# Altium PCB Industrial_IOT_Dev_Brd-v2.0.PcbDoc (part 4 of 5)
Units mil, origin at the board's own origin, x right, y up, seen from the top; angles counter-clockwise.
Board outline 3543.31 x 4724.41 mil, 2 copper layers (Top Layer, Bottom Layer), stack 61.889 mil thick; 159 components, 96 nets, 479 pads, 141 vias.
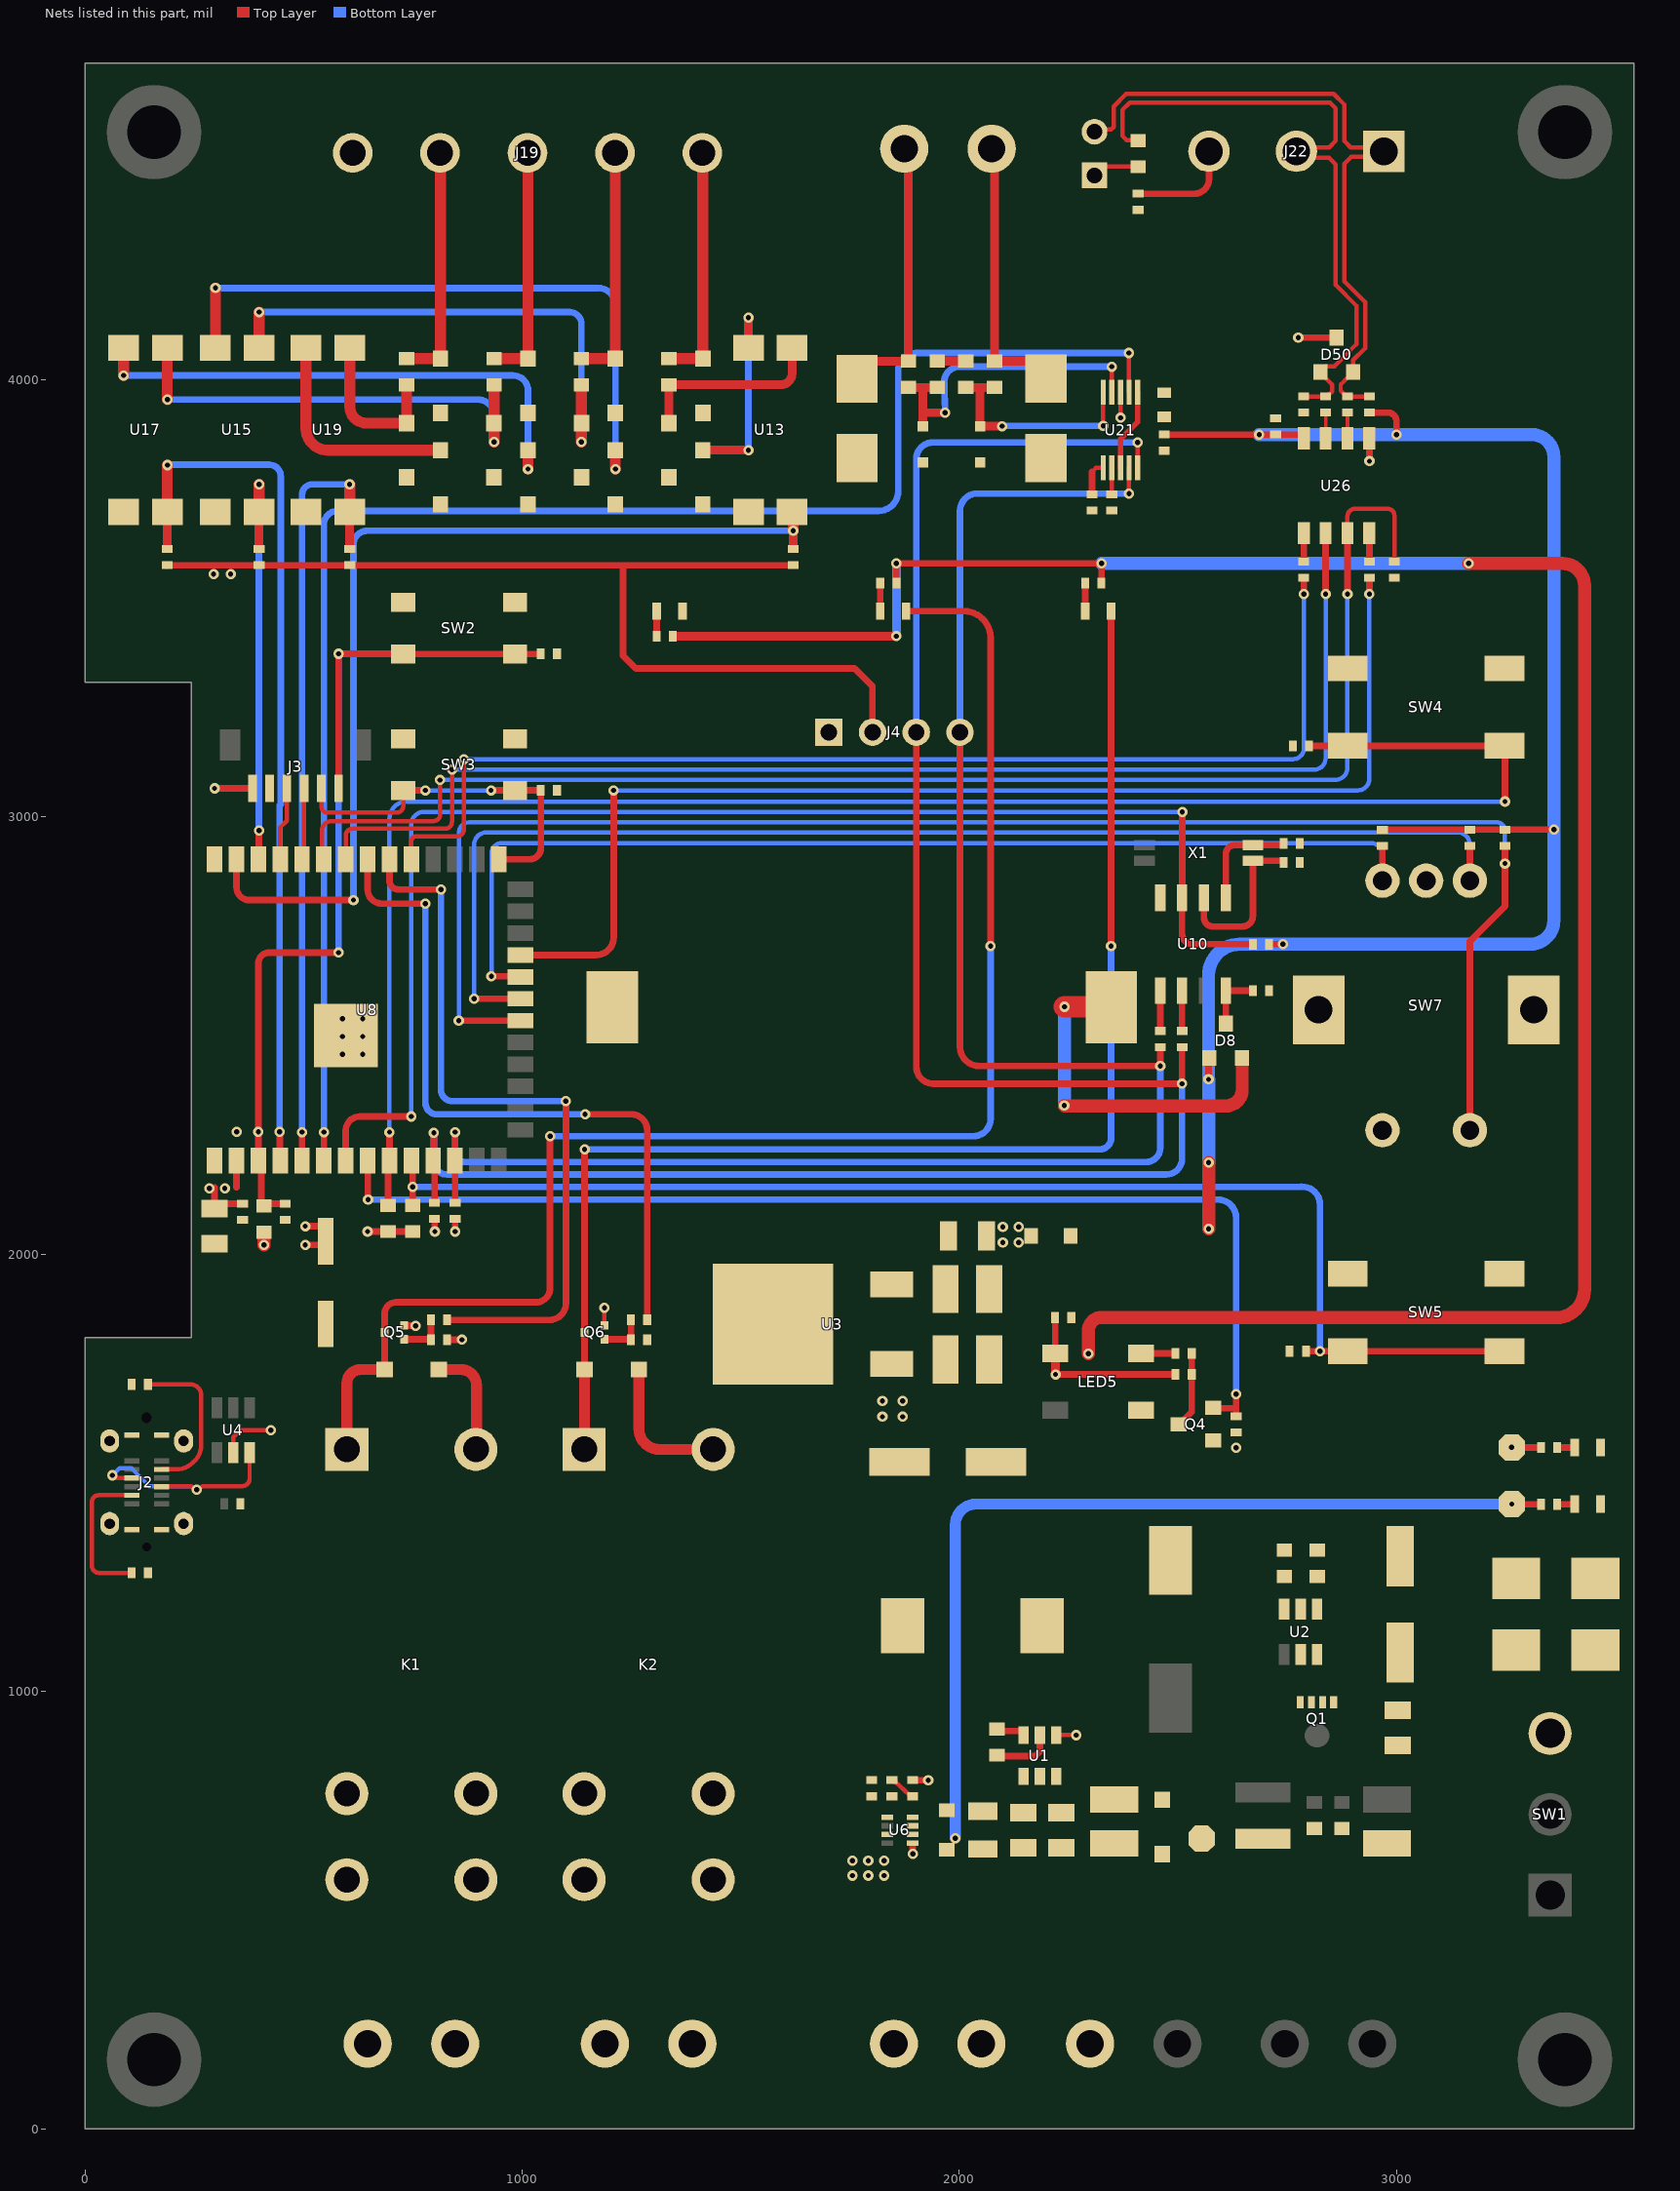
[diagram p2: the nets of this part, all layers, seen from the top]

## Via types
v1: diameter 23.62, hole 11.81, Top Layer to Bottom Layer, tented both sides, 141 vias

## Nets (pads, with @x,y where several pads share a name; then routed paths per layer and width w, separated by ;. In a path a pad name is that pad's centre, name@x,y a point inside that pad or via, vN(x,y) a via of type N, cw(c..) or ccw(c..) an arc to the next point about the centre after c; other vN are vias at no path point) (continued)
ENC_CHA: (continued)
  Top Layer w15: v1(890,2584.34) U8.21@992.63,2584.34 ; SW7.A@3167.73,2854.34 R41.1@3167.73,2934.27
  Bottom Layer w10: v1(890,2584.34) 890,2936.24 cw(c918.41,2936.24) 918.41,2964.65 3139.89,2964.65 cw(c3139.89,2936.81) 3167.73,2936.81 SW7.A@3167.73,2854.34
ENC_CHB: R42.1 SW7.B U8.22 | length 2550.9
  Top Layer w15: v1(929.52,2635.84) U8.22@994.13,2635.84 ; SW7.B@2967.73,2854.34 R42.1@2967.73,2934.27
  Bottom Layer w10: v1@930,2636.32 930,2917.61 cw(c952.4,2917.61) 952.4,2940.01 2941.91,2940.01 cw(c2941.91,2914.2) 2967.73,2914.2 SW7.B@2967.73,2854.34
ESP-EN: C29.2 C30.2 J3.6 R28.1 SW2.3 SW2.4 U8.3 | length 2262.8
  Top Layer w15: C29.2@457.79,2115.5 414.97,2115.5 R28.1@409.47,2110 403.17,2116.3 403.17,2207.9 U8.3@396.42,2214.66 v1(396.42,2279.83) 396.42,2664.7 cw(c421.72,2664.7) 421.72,2690 v1(580.23,2690) ; v1@580.23,3373.24 727.79,3373.24 SW2.3@727.97,3373.06 C30.2@1042.62,3373.06 ; J3.6@580.27,3066.04 v1(580.27,3373.41)
  Bottom Layer w15: v1@578.7,2690 580.23,2691.53 v1(580.27,3373.41)
GND: C2.2 C3.2 C4.1 C5.1 C6.1 C7.1 C8.1 C9.1 C10.1 C18.1 C19.1 C22.2 C27.2 C29.1 C30.1 C31.2 C32.1 C33.2 C34.1 C35.1 C37.2 C38.1 C39.1 C40.1 C41.1 C45.2 C78.2 D2.1 D3.1 D4.2 D5.1 D13.2 D15.1 D16.1 D19.2 D21.1 D22.1 D25.2 D27.1 D28.1 D31.2 D33.1 D34.1 D37.1 D39.1 D41.1 D43.1 D50.3 J1.2 J2.A1 J2.A12 J2.B1 J2.B12 J2.S1 J2.S2 J2.S3 J2.S4 J3.2 J4.1 J5.2 J14.1 J14.2 J19.5 LED1.2 LED2.2 LED3.2 LED5.3 Q5.2 Q6.2 R1.1 R2.1 R13.2 R14.2 R21.1 R24.1 R56.1 R57.1 R82.1 R86.1 R120.1 R121.1 R123.2 SW2.1 SW2.2 SW3.1 SW3.2 SW4.1 SW4.2 SW5.1 SW5.2 SW7.C SW7.E SW7.F SW7.G U1.4 U2.2 U3.2 U4.2 U6.1 U8.1 U8.40 U8.41 U10.4 U13.3 U15.3 U17.3 U19.3 U21.3 U26.5 | length 594.6
  Top Layer w10: U4.2@339.1,1545.69 339.1,1582.11 354.25,1597.27 v1(425,1597.27) ; Q6.2@1188.12,1837.12 v1(1188.12,1877.28) ; U1.4@2221.5,900 v1(2266.98,900) ; v1(2368.46,3913.23) U21.3@2368.46,3971.61
  Top Layer w15: Q5.2@730.51,1837.12 731.06,1836.56 755.44,1836.56 v1(756,1836) ; R56.1@828.23,1804.46 v1(862,1804.46) ; R21.1@1893.03,797 v1(1928.74,797) ; U6.1@1893.27,650.32 1893.27,628.89 v1(1893.52,628.65) ; v1(2775.31,4096.63) D50.3@2862.95,4096.63 ; U26.5@2937.81,3865.97 2937.9,3865.87 2937.9,3814.1 v1(2938,3814)
  Top Layer w20: R82.1@1949.49,4042.62 R86.1@2014.52,4042.62
  other v1: 589,2457 635,2457 589,2498 635,2498 589,2539 635,2539
I2C_SCL: J4.3 R34.1 R44.2 U8.11 U21.10 | length 4839.3
  Top Layer w10: U21.10@2407.84,3798.39 v1(2407.84,3856.77)
  Top Layer w15: U8.11@796.42,2214.66 U8.11@797.92,2213.16 ; v1(797.92,2277.76) U8.11@797.92,2213.16 ; R34.1@799.42,2117.44 799.42,2211.66 U8.11@797.92,2213.16 ; J4.3@1901.41,3193.94 1901.41,2429.34 ccw(c1940.75,2429.34) 1940.75,2390 v1(2509.54,2390) ; v1@2509.32,2390.22 2509.54,2390.44 R44.2@2509.54,2473.82
  Bottom Layer w15: v1(797.92,2277.76) 797.92,2212.41 ccw(c828.05,2212.41) 828.05,2182.27 2472.82,2182.27 ccw(c2472.82,2219) 2509.54,2219 v1(2509.54,2390) ; J4.3@1901.41,3193.94 1901.41,3818.55 cw(c1939.64,3818.55) 1939.64,3856.77 v1(2407.84,3856.77)
I2C_SDA: J4.4 R33.1 R45.2 U8.12 U21.9 | length 4259.2
  Top Layer w10: v1(2388.15,3740) U21.9@2388.15,3798.39
  Top Layer w15: R33.1@846.42,2117.44 U8.12@846.42,2214.66 v1(846.42,2279.26) ; J4.4@2001.41,3193.94 2001.41,2474.71 ccw(c2045.59,2474.71) 2045.59,2430.52 v1(2459.54,2430.52) R45.2@2459.54,2473.82
  Bottom Layer w15: v1(846.42,2279.26) 846.42,2233.17 ccw(c868.49,2233.17) 868.49,2211.1 2427.46,2211.1 ccw(c2427.46,2243.18) 2459.54,2243.18 v1(2459.54,2430.52) ; J4.4@2001.41,3193.94 2001.41,3700.02 cw(c2041.39,3700.02) 2041.39,3740 v1(2388.15,3740)
IN_1: D15.2 J19.1 R66.1 | length 547.5
  Top Layer w25: R66.1@1335.62,4048.57 D15.2@1413.2,4048.57 ; J19.1@1412.2,4519.05 1413.2,4518.05 D15.2@1413.2,4049.57
IN_2: D21.2 J19.2 R70.1 | length 547.5
  Top Layer w25: R70.1@1135.62,4048.57 D21.2@1213.2,4048.57 ; J19.2@1212.2,4519.05 1213.2,4518.05 D21.2@1213.2,4049.57
IN_3: D27.2 J19.3 R74.1 | length 547.5
  Top Layer w25: R74.1@935.62,4048.57 D27.2@1013.2,4048.57 ; J19.3@1012.2,4519.05 1013.2,4518.05 D27.2@1013.2,4049.57
IN_4: D33.2 J19.4 R78.1 | length 547.5
  Top Layer w25: R78.1@735.62,4048.57 D33.2@813.2,4048.57 ; J19.4@812.2,4519.05 813.2,4518.05 D33.2@813.2,4049.57
IO0: C34.2 J3.5 SW3.3 SW3.4 U8.27 | length 844
  Top Layer w10: J3.5@541.02,3071.08 541.06,3039.11 541.06,3023.84 ccw(c554.81,3023.84) 554.81,3010.09 712.97,3010.09 ccw(c712.97,3025) 727.88,3025 SW3.3@727.88,3060.94
  Top Layer w15: SW3.3@727.88,3060.94 v1(778.7,3060.94) ; v1(928.7,3060.94) C34.2@1042.62,3060.94 1042.62,2928.41 cw(c1017.84,2928.41) 1017.84,2903.63 U8.27@946.42,2903.63
  Bottom Layer w10: v1(778.7,3060.94) v1(928.7,3060.94)
LED: Q4.2 R36.1 U8.8 | length 2608.6
  Top Layer w15: U8.8@646.42,2214.66 647,2214.08 647,2125.58 v1(647.58,2125) ; Q4.2@2580.37,1648.55 2581.08,1647.84 2633.11,1647.84 ; R36.1@2633.11,1629.64 2633.11,1647.83 ; v1(2633.11,1680) 2633.11,1647.83
  Bottom Layer w15: v1@645,2125 v1(647.58,2125) 2591.18,2125 cw(c2591.18,2083.07) 2633.11,2083.07 v1(2633.11,1680)
MCU_RX: R115.1 U8.31 | length 2663.3
  Top Layer w10: U8.31@746.42,2903.63 746.42,2944.87 cw(c757.64,2944.87) 757.64,2956.09 851.61,2956.09 ccw(c851.61,2970.89) 866.42,2970.89 v1(866.42,3132.38)
  Top Layer w15: v1(2787.81,3510) R115.1@2787.81,3547.2
  Bottom Layer w10: v1(866.42,3132.38) 2763.45,3132.38 ccw(c2763.45,3156.74) 2787.81,3156.74 v1(2787.81,3510)
MCU_TX: R119.1 U8.23 | length 2776.8
  Top Layer w15: U8.23@995.63,2684.34 1168.69,2684.34 ccw(c1168.69,2725) 1209.35,2725 1209.35,3060.51 v1(1208.93,3060.93) ; v1(2937.81,3510) R119.1@2937.81,3547.2
  Bottom Layer w10: v1(1208.93,3060.93) 2911.31,3060.93 ccw(c2911.31,3087.43) 2937.81,3087.43 v1(2937.81,3510)
NetC1_1: C1.1 L1.1 U1.5 | length 149.7
  Top Layer w15: C1.1@2086.01,852.19 2173.52,852.19 2184.1,862.76 U1.5@2184.1,910
NetC1_2: C1.2 U1.6 | length 67.3
  Top Layer w15: C1.2@2086.01,909.19 2142.38,909.19 2146.69,904.88 U1.6@2146.69,900
NetC3_1: C3.1 C4.2 C17.2 D1.2 Q1.1 Q1.2 Q1.3 R6.1 SW1.3 U2.6
NetC9_2: C9.2 C10.2 F2.1 L1.2 U1.1
NetC17_1: C17.1 U2.1
NetC19_2: C19.2 F3.1 U3.3
NetC39_2: C39.2 D8.3 U10.8 | length 137.4
  Top Layer w15: D8.3@2609.54,2527.37 U10.8@2609.54,2602.76 C39.2@2671.54,2602.76
NetC40_2: C40.2 U10.1 X1.1 | length 247.9
  Top Layer w15: U10.1@2609.54,2815.36 2609.54,2915.93 cw(c2629.33,2915.93) 2629.33,2935.72 X1.1@2671.51,2935.72 2740,2935.72 2741.5,2937.22 C40.2@2741.5,2940.72
NetC41_2: C41.2 U10.2 X1.4 | length 383.3
  Top Layer w15: U10.2@2559.54,2815.36 2559.54,2770.2 ccw(c2580.17,2770.2) 2580.17,2749.57 2647.27,2749.57 ccw(c2647.27,2773.81) 2671.51,2773.81 X1.4@2671.51,2900.28 2740,2900.28 2741.5,2898.78 C41.2@2741.5,2895.28
NetD1_1: D1.1 D4.1
NetD8_2: D8.2 J5.1 | length 834.5
  Top Layer w20: J5.1@2346.44,2565.91 J5.1@2347.52,2564.84
  Top Layer w30: v1(2240,2340) 2240.91,2339.09 2609.78,2339.09 ccw(c2609.78,2376.26) 2646.95,2376.26 D8.2@2646.95,2448.63
  Top Layer w50: v1(2240.43,2565.91) J5.1@2346.44,2565.91
  Bottom Layer w30: v1(2240,2340) 2240.43,2340.43 v1(2240.43,2565.91)
NetD9_1: D9.1 K1.1 LED8.2 Q5.3 | length 3501.3
  Top Layer w15: D9.1@685.23,1736.37 Q5.3@685.23,1821.37 685.23,1863.76 cw(c711.47,1863.76) 711.47,1890 1031.56,1890 ccw(c1031.56,1922.13) 1063.69,1922.13 v1(1063.69,2270) ; LED8.2@1878.08,3471 2010.52,3471 cw(c2010.52,3410.08) 2071.43,3410.08 v1(2071.43,2705)
  Top Layer w25: K1.1@598.92,1553.63 598.92,1704.46 cw(c630.83,1704.46) 630.83,1736.37 D9.1@685.23,1736.37
  Bottom Layer w15: v1(1063.69,2270) 2030.34,2270 2031.05,2269.99 ccw(c2031.7,2309.72) 2071.43,2309.72 v1(2071.43,2705)
NetD10_1: D10.1 K2.1 LED9.2 Q6.3 | length 3110
  Top Layer w15: K2.1@1141.54,1553.63 K2.1@1142.85,1554.94 ; D10.1@1142.85,1736.37 1142.85,2235.51 1145,2237.67 v1@1145,2240 ; v1(2347.08,2705) LED9.2@2347.08,3470.99
  Top Layer w25: K2.1@1142.85,1554.94 D10.1@1142.85,1736.37
  Bottom Layer w15: v1@1145,2240 2321.65,2240 ccw(c2321.65,2265.42) 2347.08,2265.42 v1(2347.08,2705)
  other v1: 1142.85,2240
NetD13_1: D13.1 U13.2 | length 476.9
  Top Layer w20: D13.1@1413.17,3839.13 v1(1517.47,3839.13) ; U13.2@1517.47,4073.2 v1(1517.47,4142.47)
  Bottom Layer w15: v1(1517.47,3839.13) v1(1517.47,4142.47)
NetD16_2: D16.2 R66.2 U13.1 | length 442.6
  Top Layer w20: D16.2@1335.61,3901.15 R66.2@1335.62,3988.57 1591.1,3988.57 ccw(c1591.1,4014.94) 1617.47,4014.94 U13.1@1617.47,4073.2
NetD19_1: D19.1 U15.2 | length 1492.2
  Top Layer w25: U15.2@298.2,4073.2 v1@298.2,4210 ; v1(1213.2,3795.82) D19.1@1213.2,3839.12
  Bottom Layer w15: v1(298.47,4210) 1135.61,4210 1174.07,4210 cw(c1174.07,4170.87) 1213.2,4170.87 v1(1213.2,3795.82)
NetD22_2: D22.2 R70.2 U15.1 | length 1235.2
  Top Layer w25: U15.1@398.2,4073.2 v1@398.2,4155 ; v1(1135.59,3857.83) D22.2@1135.59,3901.13 R70.2@1135.62,3988.57
  Bottom Layer w15: v1(398.47,4155) 1074.79,4155 1108.47,4155 cw(c1108.47,4127.86) 1135.61,4127.86 v1@1135.61,3857.84
NetD25_1: D25.1 U17.2 | length 1231.2
  Top Layer w25: U17.2@88.2,4073.2 88.2,4010.26 v1(88.47,4010) ; v1@1013.21,3795.83 D25.1@1013.21,3839.13
  Bottom Layer w15: v1(88.47,4010) 977.06,4010 978.08,4010.02 cw(c978.91,3975.43) 1013.51,3975.46 1013.51,3975.38 1013.51,3796.13 v1(1013.2,3795.82)
NetD28_2: D28.2 R74.2 U17.1 | length 1077.2
  Top Layer w25: U17.1@188.2,4073.2 188.2,3955.26 v1(188.47,3955) ; v1(935.59,3857.83) D28.2@935.59,3901.13 R74.2@935.62,3988.57
  Bottom Layer w15: v1(188.47,3955) 897.97,3955 cw(c897.97,3917.38) 935.59,3917.38 v1(935.59,3857.83)
NetD31_1: D31.1 U19.2 | length 520.4
  Top Layer w25: U19.2@505.46,4073.2 505.46,3889.12 ccw(c555.47,3889.12) 514.22,3860.86 ccw(c555.47,3889.12) 527.2,3847.88 ccw(c555.47,3889.12) 555.47,3839.12 D31.1@813.21,3839.12
NetD34_2: D34.2 R78.2 U19.1 | length 373.3
  Top Layer w25: U19.1@605.46,4073.2 605.46,3939.18 ccw(c643.51,3939.18) 643.51,3901.13 D34.2@735.59,3901.13 R78.2@735.62,3988.57
NetJ22_3: J22.3 R121.2 | length 244.6
  Top Layer w15: R121.2@2409.1,4425.73 2537.59,4425.73 ccw(c2537.59,4459.14) 2571,4459.14 J22.3@2571,4522.75
NetJ23_1: J23.1 R122.1 | length 108.3
  Top Layer w10: J23.1@2309.09,4467.47 2329.09,4487.47 R122.1@2409.1,4487.47
NetLED1_1: LED1.1 R7.2 | length 57
  Top Layer w15: R7.2@1307.71,3413.72 LED1.1@1307.71,3470.72
NetLED2_1: LED2.1 R8.2 | length 41.1
  Top Layer w8: LED2.1@3407.86,1428.04 LED2.1@3407.86,1428.52
  Top Layer w15: R8.2@3367.24,1428.04 LED2.1@3407.86,1428.04
NetLED3_1: LED3.1 R12.2 | length 40.6
  Top Layer w15: R12.2@3367.24,1558 LED3.1@3407.86,1558
NetLED5_4: LED5.4 R38.2 | length 78.5
  Top Layer w15: LED5.4@2415.98,1773.15 R38.2@2494.52,1773.15
NetLED8_1: LED8.1 R60.1 | length 64
  Top Layer w15: LED8.1@1819.02,3471 R60.1@1819.02,3535
NetLED9_1: LED9.1 R61.1 | length 64
  Top Layer w15: LED9.1@2288.02,3470.99 R61.1@2288.02,3535
NetQ1_4: Q1.4 U2.5
NetQ4_3: Q4.3 R37.1 R38.1 | length 175.5
  Top Layer w15: Q4.3@2501.63,1611.14 2503.6,1611.14 2531.52,1639.07 R37.1@2531.52,1725 R38.1@2531.52,1773.15
NetQ5_1: Q5.1 R52.2 R56.2 | length 110.7
  Top Layer w15: Q5.1@730.51,1805.62 788.56,1805.62 791.23,1802.96 R56.2@791.23,1799.46 ; R56.2@791.23,1804.46 R52.2@791.23,1849.78
NetQ6_1: Q6.1 R53.2 R57.2 | length 110.7
  Top Layer w15: Q6.1@1188.12,1805.62 1246.18,1805.62 1248.85,1802.96 R57.2@1248.85,1799.46 ; R57.2@1248.85,1804.46 R53.2@1248.85,1849.78
NetR1_2: R1.2 U21.6 | length 80.3
  Top Layer w10: 2303.74,3789.89 2312.24,3798.39 U21.6@2329.09,3798.39
  Top Layer w15: R1.2@2303.74,3738.51 2303.74,3789.89
NetR2_2: R2.2 U21.7 | length 59.9
  Top Layer w10: R2.2@2348.78,3738.5 U21.7@2348.78,3798.39
NetR6_2: R6.2 U2.3
NetR17_1: R17.1 R21.2 U6.4 | length 60.9
  Top Layer w10: R17.1@1850.79,795.49 R21.2@1888.03,761.5
  Top Layer w15: R17.1@1845.79,796.99 R17.1@1850.79,795.49 ; R21.2@1888.03,761.5 R21.2@1893.03,760
NetR44_1: R44.1 U10.6 | length 91.9
  Top Layer w15: R44.1@2509.54,2510.82 U10.6@2509.54,2602.76
NetR45_1: R45.1 U10.5 | length 91.9
  Top Layer w15: R45.1@2459.54,2510.82 U10.5@2459.54,2602.76
NetR115_2: R115.2 U26.1 | length 65.2
  Top Layer w15: R115.2@2787.81,3584.2 U26.1@2787.81,3649.43
NetR116_1: R116.1 U26.7 | length 59
  Top Layer w8: U26.7@2837.81,3865.97 R116.1@2837.81,3925
NetR118_1: R118.1 U26.6 | length 59
  Top Layer w8: U26.6@2887.81,3865.97 R118.1@2887.81,3925
NetR119_2: R119.2 U26.4 | length 65.2
  Top Layer w15: R119.2@2937.81,3584.2 U26.4@2937.81,3649.43
RELAY_1: R52.1 U8.32 | length 1693
  Top Layer w15: U8.32@696.42,2903.63 696.42,2854.68 ccw(c716.75,2854.68) 716.75,2834.34 v1(814.13,2834.34) ; R52.1@828.23,1849.78 1062.44,1849.78 ccw(c1062.44,1887.34) 1100,1887.34 v1(1100,2350)
  Bottom Layer w15: v1(814.13,2834.34) 814.13,2376.48 ccw(c840.61,2376.48) 840.61,2350 v1(1100,2350)
RELAY_2: R53.1 U8.33 | length 1652.5
  Top Layer w15: U8.33@646.42,2903.63 646.42,2834.34 ccw(c678.7,2834.34) 649.57,2820.43 ccw(c678.7,2834.34) 664.79,2805.21 ccw(c678.7,2834.34) 678.7,2802.06 v1(778.7,2802.06) ; v1(1143.92,2320) 1249.6,2320 cw(c1249.6,2283.75) 1285.85,2283.75 R53.1@1285.85,1849.78
  Bottom Layer w15: v1(778.7,2802.06) 778.7,2346.43 ccw(c805.13,2346.43) 805.13,2320 v1(1143.92,2320)
RLY1_COM: J9.2 K1.4 K1.5
RLY1_NO: J9.1 K1.3 K1.6
RLY2_COM: J10.2 K2.4 K2.5
RLY2_NO: J10.1 K2.3 K2.6
RS485_N: D50.1 J22.2 R116.2 R120.2 R122.2 | length 1540.6
  Top Layer w10: R122.2@2409.1,4547.47 2407.99,4548.58 2382.45,4548.58 2372.85,4558.18 2372.85,4617.18 2389.71,4634.04 2847.77,4634.04 2861,4620.81 2861,4546.96 2845.74,4531.7 2779.95,4531.7 J22.2@2771,4522.75 2785.84,4507.9 2845.58,4507.9 2861,4492.49 2861,4216.72 2908.11,4169.6 2908.11,4081.32 2857.8,4031 2836.69,4031 D50.1@2825.55,4019.86 ; R120.2@2787.81,3962 R116.2@2837.81,3962 2841.81,3966 2845.65,3966 2852.23,3972.57 2852.23,3989.29 D50.1@2836.74,4004.78 ; D50.1@2825.55,4017.89 2825.55,4015.92 D50.1@2836.69,4004.78
RS485_P: D50.2 J22.1 J23.2 R117.2 R118.2 | length 1564.6
  Top Layer w10: J23.2@2309.09,4567.47 2314.17,4572.55 2346.99,4572.55 2352.85,4578.4 2352.85,4625.46 2381.42,4654.04 2856.05,4654.04 2881,4629.09 2881,4546.05 2895.34,4531.7 2962.05,4531.7 J22.1@2971,4522.75 2958.17,4509.93 2896.2,4509.93 2881,4494.73 2881,4225 2928.11,4177.88 2928.11,4072.31 2900.94,4045.14 2900.94,4018.48 D50.2@2900.36,4017.89 2900.36,4015.92 2889.21,4004.78 2887.95,4004.78 2872.23,3989.06 2872.23,3974.8 2880.31,3966.72 2880.31,3966 2884.31,3962 R118.2@2887.81,3962 R117.2@2937.81,3962.01
RTC_INT: R46.1 U8.7 U10.3 | length 3139.2
  Top Layer w15: U8.7@596.42,2214.66 596.42,2282.72 cw(c628.7,2282.72) 598.15,2293.15 cw(c628.7,2282.72) 618.27,2313.27 cw(c628.7,2282.72) 628.7,2315 v1(746.42,2315) ; v1(2510,3011.65) 2509.77,3011.42 2509.77,2815.59 U10.3@2509.54,2815.36 2509.54,2732.8 ccw(c2533.28,2732.8) 2533.28,2709.06 R46.1@2671.54,2709.06
  Bottom Layer w10: v1(746.42,2315) 746.42,2983.53 cw(c774.54,2983.53) 774.54,3011.65 v1(2510,3011.65)
RXD0: J3.4 U8.36 | length 175.6
  Top Layer w10: U8.36@496.42,2903.63 501.27,2908.49 J3.4@501.27,3077.2
SEL_BUT: C35.2 R35.1 SW4.3 SW4.4 U8.9 | length 4038.2
  Top Layer w15: R35.1@693.42,2111.94 693.42,2211.66 U8.9@696.42,2214.66 v1(696.42,2279.26) ; C35.2@2799.6,3162.74 SW4.4@3246.86,3162.74 3248.03,3161.56 v1(3248.03,3035.46)
  Bottom Layer w10: v1(696.42,2279.26) 696.42,2996.02 cw(c735.85,2996.02) 735.85,3035.46 v1(3248.03,3035.46) ; v1@3245.43,3037.39 v1@3248.03,3040
TXD0: J3.3 U8.37 | length 168.3
  Top Layer w10: U8.37@446.42,2903.63 446.42,2976.21 461.73,2991.53 J3.3@461.73,3065.6
TYPEC_CC1: J2.A5 R13.1 | length 346.5
  Top Layer w10: R13.1@106.97,1271.25 31.75,1271.25 cw(c31.75,1287.26) 15.74,1287.26 15.74,1433.46 cw(c31.02,1433.46) 31.02,1448.74 J2.A5@106.97,1448.74
TYPEC_CC2: J2.B5 R14.1 | length 371.6
  Top Layer w10: R14.1@143.97,1702.25 240.98,1702.25 cw(c240.98,1677.35) 265.88,1677.35 265.88,1563.85 265.88,1563.79 cw(c214.37,1563.79) 247.65,1524.47 245.7,1522.82 cw(c208.92,1560.32) 208.92,1507.8 J2.B5@175.08,1507.8
TYPEC_D_N: J2.A7 J2.B7 U4.3 | length 540
  Top Layer w10: v1(62.27,1494.24) ccw(c68.4,1494.24) 62.61,1492.24 ccw(c68.4,1494.24) 68.4,1488.11 J2.A7@106.97,1488.11 ; J2.B7@175.08,1468.43 cw(c177.27,1466.24) 177.27,1469.33 189.02,1469.33 cw(c190.07,1468.28) 190.07,1469.77 237.8,1469.77 cw(c237.8,1455.58) 247.83,1465.61 249.38,1464.06 ccw(c255.67,1470.36) v1(255.67,1461.46) ccw(c255.67,1470.36) 261.96,1464.06 263.51,1465.61 cw(c273.55,1455.58) 273.55,1469.77 360.09,1469.77 ccw(c360.09,1486.18) 376.5,1486.18 U4.3@376.5,1545.69
  Bottom Layer w10: v1@64.88,1496.66 79.22,1511 105.56,1511 146.79,1469.77 237.8,1469.77 cw(c237.8,1455.58) 247.83,1465.61 249.38,1464.06 ccw(c255.67,1470.36) v1(255.67,1461.46)